# Altium PCB PCB1.PcbDoc (part 1 of 2)
Units mil, origin at the board's own origin, x right, y up, seen from the top; angles counter-clockwise.
Board outline 6000 x 4000 mil, 2 copper layers (Top Layer, Bottom Layer); 140 components, 124 nets, 525 pads, 86 vias.
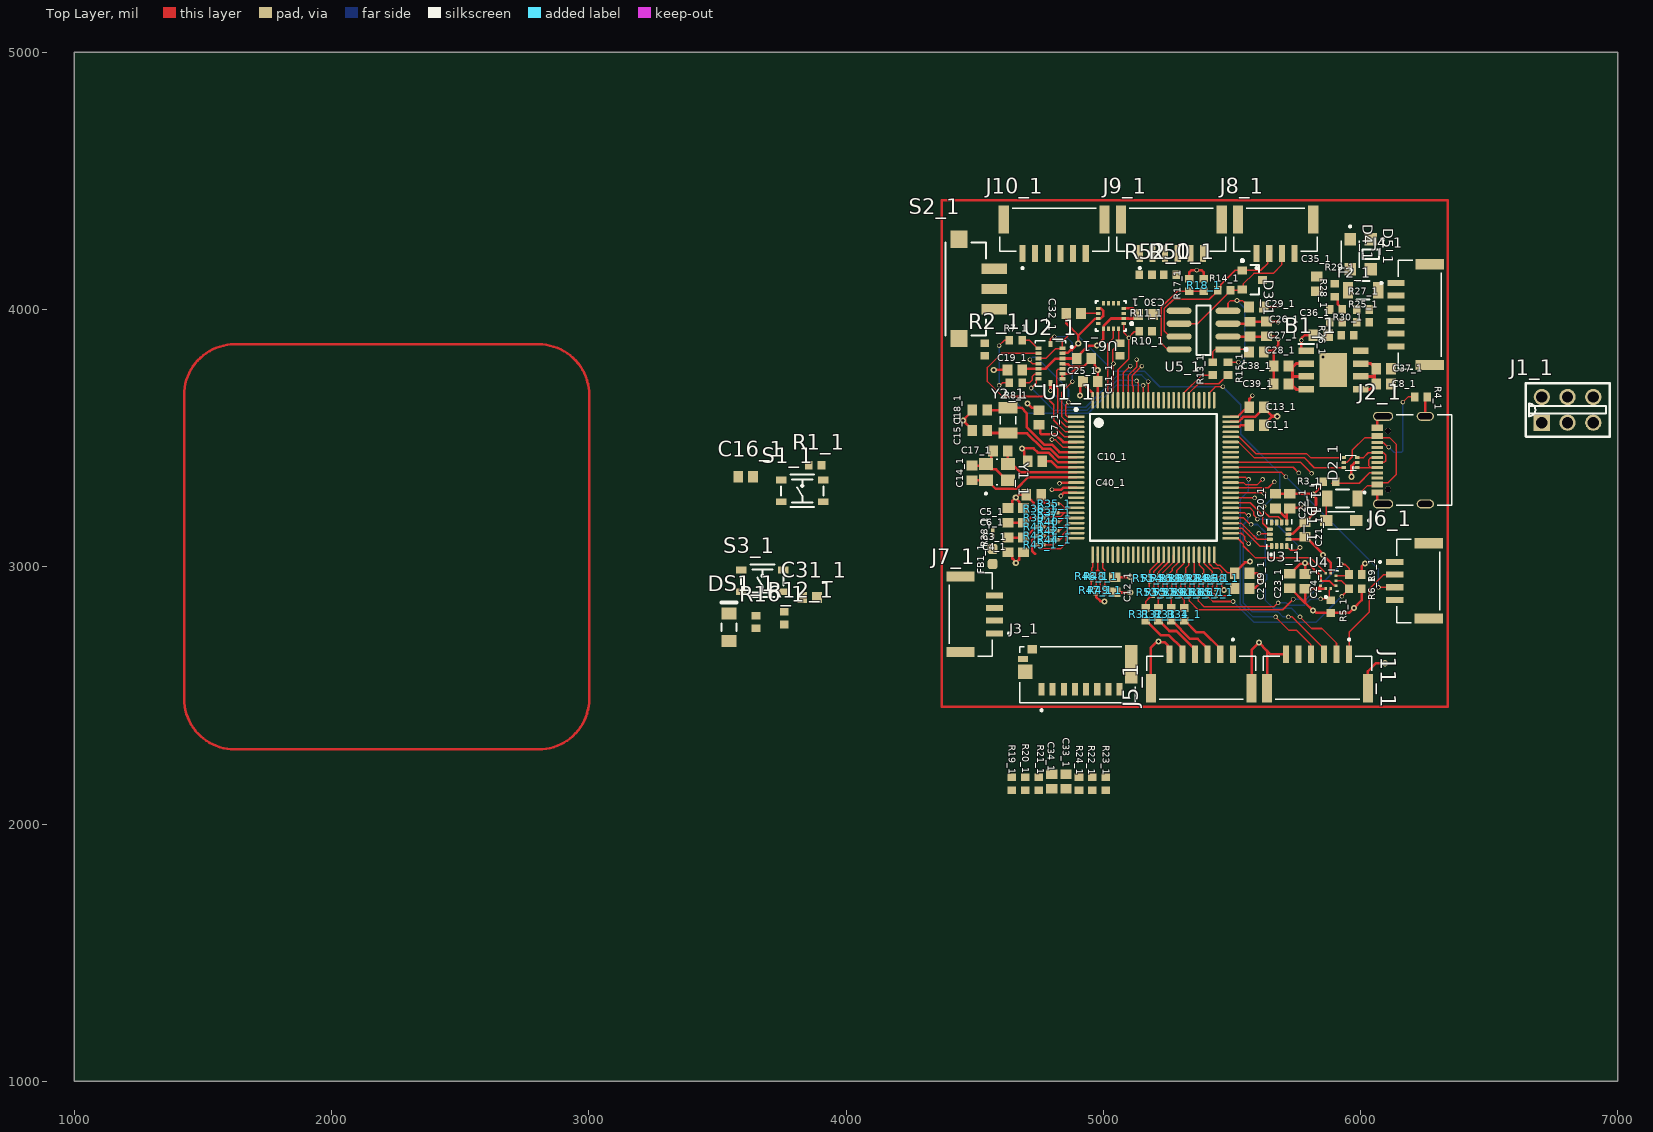
[diagram p0: Top Layer view]
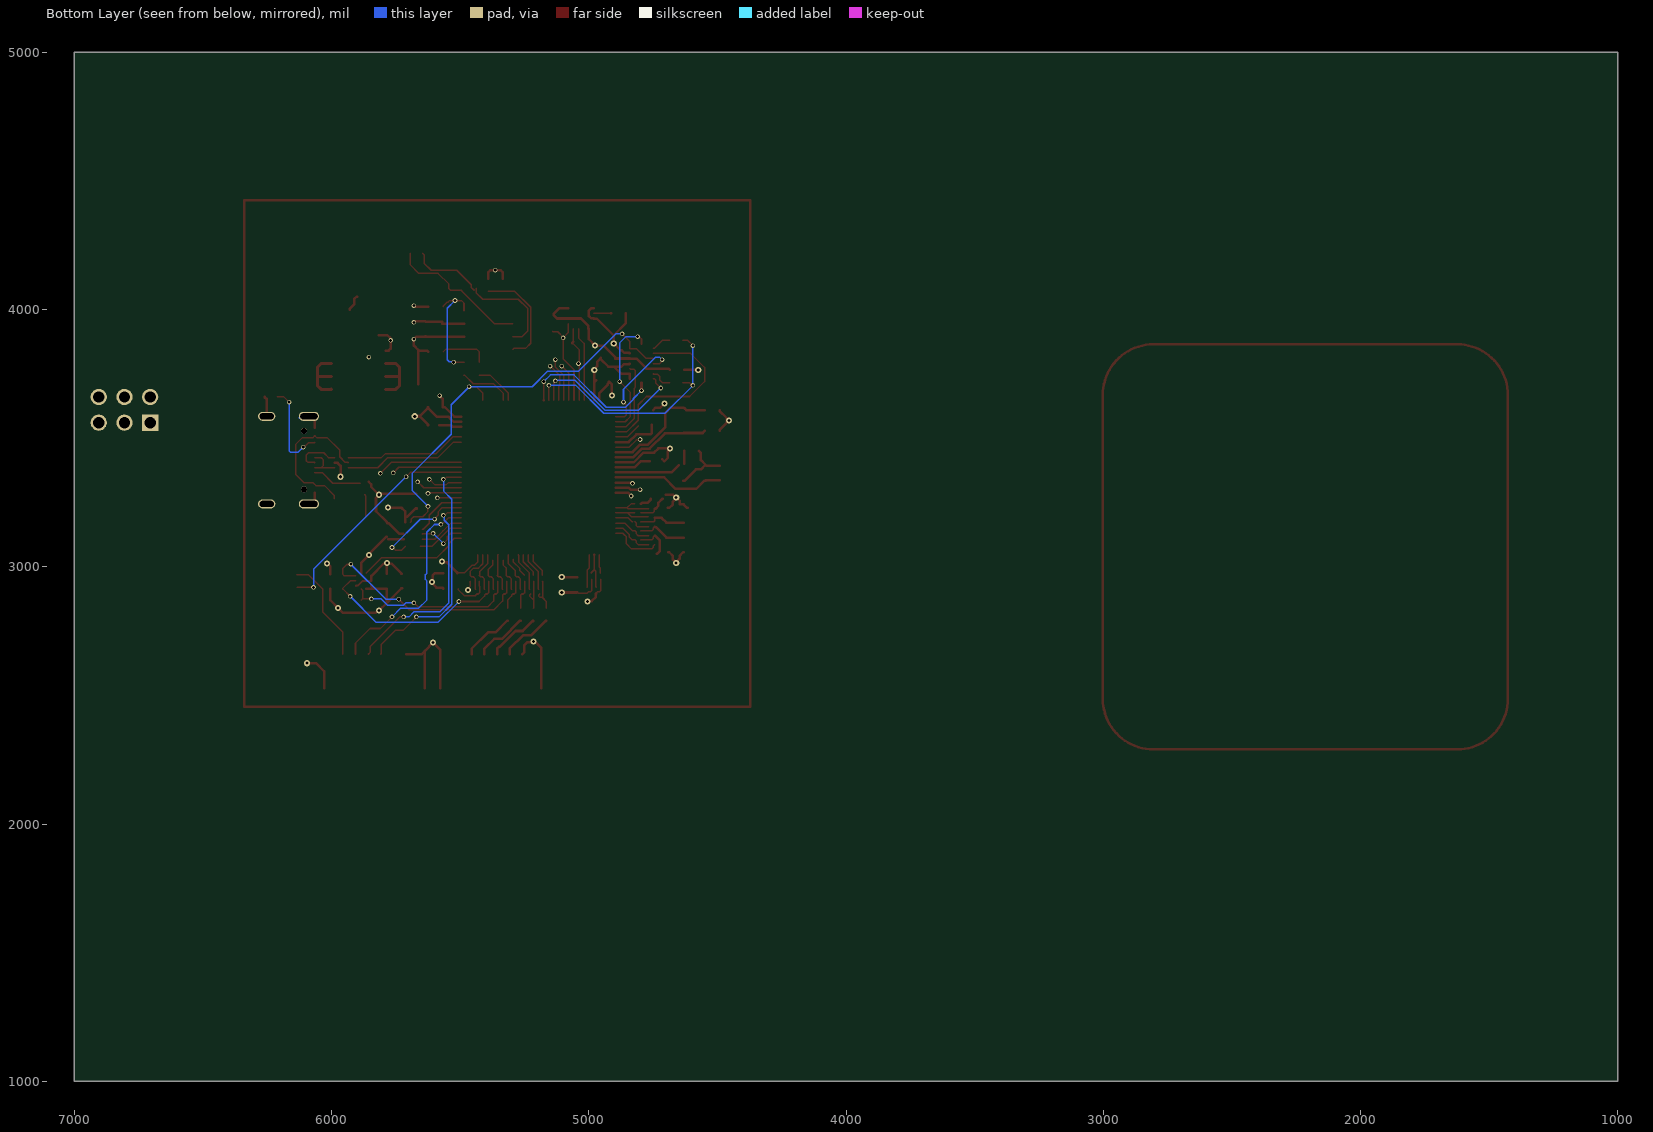
[diagram p1: Bottom Layer view, seen from below]

## Layer stack, top to bottom
Top Solder: solder mask 0.4, Solder Resist, Dk 3.5
Top Layer: signal copper 1.4
Dielectric 1: dielectric 12.6, FR-4, Dk 4.8
Bottom Layer: signal copper 1.4
Bottom Solder: solder mask 0.4, Solder Resist, Dk 3.5

## Board outline
1000,1000 7000,1000 7000,5000 1000,5000

## Design rules (kind name [scope] priority, off if disabled: settings)
Clearance [All] p1: gap=10 ignorepadtopadclearanceinfootprint=FALSE except(0: Arc-Hole Track-Hole SMDPad-Hole THPad-Hole Via-Hole Fill-Hole Poly-Hole Region-Hole Text-Hole)
PolygonConnect [All] p1: connectstyle=Relief reliefconductorwidth=10 reliefentries=4 polygonreliefangle="90 Angle" airgapwidth=10
RoutingVias [All] p1: holewidth=28 width=50 viastyle="Through Hole" minholewidth=28 minwidth=50 maxholewidth=28 maxwidth=50
SolderMaskExpansion [All] p1: expansion=4 istentingtop=FALSE
Width [All] p1: maxlimit=10 minlimit=10 preferedwidth=10
30 further rules are at their usual default settings.

## Components (designator, comment, footprint, x,y, rotation, side; value= is the part's Value field where it differs from the comment)
B1_1 "AP7362A-33SP-13" SOIC127P600X150-9N 5895,3765 r0 top
C1_1 "2.2uF" CAPC1608X92X38ML15T08 5596.46,3550 r180 top
C2_1 "2.2uF" CAPC1608X92X38ML15T08 5540,2915 r180 top
C3_1 "1uF" CAPC1608X92X38ML15T08 4630,3085 r90 top
C4_1 "0.1uF" CAPC1608X92X38ML15T08 4690,3085 r90 top
C5_1 "1uF" CAPC1608X92X38ML15T08 4630,3200 r270 top
C6_1 "0.1uF" CAPC1608X92X38ML15T08 4690,3200 r270 top
C7_1 "0.1uF" CAPC1608X92X38ML15T08 4750,3580 r90 top
C8_1 "4.7uF" CAPC1608X92X38ML15T08 6090,3710 r180 top
C9_1 "0.1uF" CAPC1608X92X38ML15T08 5540,2975 r180 top
C10_1 "0.1uF" CAPC1608X92X38ML15T08 4735,3410 r0 top
C11_1 "0.1uF" CAPC1608X92X38ML15T08 4950,3720 r180 top
C12_1 "0.1uF" CAPC1608X92X38ML15T08 5045,2930 r270 top
C13_1 "0.1uF" CAPC1608X92X38ML15T08 5596.46,3620 r180 top
C14_1 "15pF" CAPC1608X92X38ML15T08 4490,3365 r90 top
C15_1 "4.7pF" CAPC1608X92X38ML15T08 4520,3529.21 r180 top
C16_1 "0.1uF" CAPC1608X92X38ML15T08 3610,3350 r0 top
C17_1 "15pF" CAPC1608X92X38ML15T08 4600,3450 r180 top
C18_1 "4.7pF" CAPC1608X92X38ML15T08 4520,3609.21 r180 top
C19_1 "0.1uF" CAPC1608X92X38ML15T08 4656.46,3765 r0 top
C20_1 "0.1uF" CAPC1608X92X38ML15T08 5670,3255 r90 top
C21_1 "2.2uF" CAPC1608X92X38ML15T08 5785,3145 r90 top
C22_1 "10nF" CAPC1608X92X38ML15T08 5725,3255 r90 top
C23_1 "0.1uF" CAPC1608X92X38ML15T08 5725,2945 r90 top
C24_1 "0.1uF" CAPC1608X92X38ML15T08 5785,2943.54 r90 top
C25_1 "0.1uF" CAPC1608X92X38ML15T08 4925,3810 r180 top
C26_1 "1uF" CAPC1608X92X38ML15T08 5635,3925 r270 top
C27_1 "1uF" CAPC1608X92X38ML15T08 5570,3923.54 r270 top
C28_1 "10nF" CAPC1608X92X38ML15T08 5595,3835 r0 top
C29_1 "10nF" CAPC1608X92X38ML15T08 5595,4010 r0 top
C30_1 "1uF" CAPC1608X92X38ML15T08 5165,3980 r0 top
C31_1 "0.1uF" CAPC1608X92X38ML15T08 3858.54,2880 r0 top
C32_1 "10uF" CAPC1608X92X38ML15T08 4885,3985 r180 top
C33_1 "1uF" CAPC1608X92X38ML15T08 4855,2165 r90 top
C34_1 "0.1uF" CAPC1608X92X38ML15T08 4800,2165 r90 top
C35_1 "1nF" CAPC1608X92X38ML15T08 5830,4100 r270 top
C36_1 "1nF" CAPC1608X92X38ML15T08 5845,3900 r0 top
C37_1 "10uF" CAPC1608X92X38ML15T08 6090,3770 r180 top
C38_1 "0.1uF" CAPC1608X92X38ML15T08 5691.46,3780 r0 top
C39_1 "10uF" CAPC1608X92X38ML15T08 5691.46,3710 r0 top
C40_1 "0.1uF" CAPC1608X92X38ML15T08 4730,3280 r180 top
D1_1 "sch" SODFL3619X98N 5925,3180 r180 top
D2_1 "NUF2042XV6T1G" SOT-563 5961.57,3404.68 r90 top
D3_1 "TVS" ONSC-SOT-23-3-318-08_V 5580,4115 r0 top
D4_1 "sch" SODFL3619X98N 5960,4215 r270 top
D5_1 "TVS" ONSC-SOD-123FL-2-498_V 6040,4215 r270 top
DS1_1 "SML-LX1206YC-TR" LUMX-SML-LX1206YC-TR_V 3545,2765 r90 top
F1_1 "fuse" FP-MF-NSMF012-2-MFG 5930,3265 r180 top value=1.35-8.5Ω
F2_1 "fuse" FP-MF-NSMF012-2-MFG 6010,4075 r180 top value=1.35-8.5Ω
FB1_1 "100 Ohms @ 100 MHz" BEADC1608X75N 4570,3040 r90 top
J1_1 "6x1Female" stLinkHeader 6705,3560 r90 top
J2_1 "TYPE-C-31-M-12" HRO_TYPE-C-31-M-12 6252.01,3414.53 r90 top
J3_1 "10067099-200LF" AMPHENOL_10067099-200LF 4900,2580 r180 top
J4_1 "BM06B-GHS-TBT(LF)(SN)(N)" JST_BM06B-GHS-TBT(LF)(SN)(N) 6270,3980 r90 top
J5_1 "BM06B-GHS-TBT(LF)(SN)(N)" JST_BM06B-GHS-TBT(LF)(SN)(N) 5381.18,2528.11 r0 top
J6_1 "BM04B-GHS-TBT(LF)(SN)(N)" JST_BM04B-GHS-TBT(LF)(SN)(N) 6265,2945 r90 top
J7_1 "BM04B-GHS-TBT(LF)(SN)(N)" JST_BM04B-GHS-TBT(LF)(SN)(N) 4445,2815 r270 top
J8_1 "BM04B-GHS-TBT(LF)(SN)(N)" JST_BM04B-GHS-TBT(LF)(SN)(N) 5670,4350 r180 top
J9_1 "BM06B-GHS-TBT(LF)(SN)(N)" JST_BM06B-GHS-TBT(LF)(SN)(N) 5265,4350 r180 top
J10_1 "BM06B-GHS-TBT(LF)(SN)(N)" JST_BM06B-GHS-TBT(LF)(SN)(N) 4809.13,4350 r180 top
J11_1 "BM06B-GHS-TBT(LF)(SN)(N)" JST_BM06B-GHS-TBT(LF)(SN)(N) 5833.03,2528.11 r0 top
R1_1 "10 K" RESC1609X55X30LL10T20 3880,3395 r0 top
R2_1 "10 K" RESC1609X55X30LL10T20 4540,3845 r90 top
R3_1 "5.1 K" RESC1609X55X30LL10T20 5880,3330 r180 top
R4_1 "5.1 K" RESC1609X55X30LL10T20 6235,3660 r0 top
R5_1 "4.7 K" RESC1609X55X30LL10T20 5885,2845 r270 top
R6_1 "4.7 K" RESC1609X55X30LL10T20 5980.14,2915.02 r0 top
R7_1 "22 Ohm" RESC1609X55X30LL10T20 4660,3880 r180 top
R8_1 "22 Ohm" RESC1609X55X30LL10T20 4660,3715 r180 top
R9_1 "4.7 K" RESC1609X55X30LL10T20 5980.14,2970.02 r0 top
R10_1 "2.7 K" RESC1609X55X30LL10T20 5065,3845 r90 top
R11_1 "2.7 K" RESC1609X55X30LL10T20 5165,3915 r180 top
R12_1 "10 K" RESC1609X55X30LL10T20 3760,2800 r90 top
R13_1 "0 Ohm" RESC1609X55X30LL10T20 5425,3770 r270 top
R14_1 "120 Ohm" RESC1609X55X30LL10T20 5470,4075 r0 top
R15_1 "0 Ohm" RESC1609X55X30LL10T20 5485,3770 r270 top
R16_1 "500 Ohm" RESC1609X55X30LL10T20 3650,2785 r90 top
R17_1 "0 DNS" RESC1609X55X30LL10T20 5335,4095 r90 top
R18_1 "0 Ohm" RESC1609X55X30LL10T20 5390,4095 r90 top
R19_1 "4.7 K" RESC1609X55X30LL10T20 4645,2156.38 r270 top
R20_1 "4.7 K" RESC1609X55X30LL10T20 4697.14,2156.38 r270 top
R21_1 "4.7 K" RESC1609X55X30LL10T20 4749.29,2156.38 r270 top
R22_1 "4.7 K" RESC1609X55X30LL10T20 4957.86,2156.38 r270 top
R23_1 "4.7 K" RESC1609X55X30LL10T20 5010,2156.38 r270 top
R24_1 "47 Ohm" RESC1609X55X30LL10T20 4905.71,2156.38 r90 top
R25_1 "180 K" RESC1609X55X30LL10T20 6010,3950 r180 top
R26_1 "100 Ohm" RESC1609X55X30LL10T20 5905,3950 r180 top
R27_1 "15 K" RESC1609X55X30LL10T20 6010,4000 r180 top
R28_1 "100 Ohm" RESC1609X55X30LL10T20 5905,4000 r180 top
R29_1 "27 K" RESC1609X55X30LL10T20 5900,4075 r270 top
R30_1 "24 K" RESC1609X55X30LL10T20 5950,3900 r180 top
R31_1 "47 Ohm" RESC1609X55X30LL10T20 5165,2815 r90 top
R32_1 "47 Ohm" RESC1609X55X30LL10T20 5215,2815 r90 top
R33_1 "47 Ohm" RESC1609X55X30LL10T20 5265,2815 r90 top
R34_1 "47 Ohm" RESC1609X55X30LL10T20 5315,2815 r90 top
R35_1 "CRCW02010000Z0ED" RESC0603X28X15NL5T05 4810,3245 r0 top
R36_1 "CRCW02010000Z0ED" RESC0603X28X15NL5T05 4755,3225 r0 top
R37_1 "CRCW02010000Z0ED" RESC0603X28X15NL5T05 4810,3210 r0 top
R38_1 "CRCW02010000Z0ED" RESC0603X28X15NL5T05 4570,3130 r270 top
R39_1 "CRCW02010000Z0ED" RESC0603X28X15NL5T05 4755,3190 r0 top
R40_1 "CRCW02010000Z0ED" RESC0603X28X15NL5T05 4810,3175 r0 top
R41_1 "CRCW02010000Z0ED" RESC0603X28X15NL5T05 4755,3155 r0 top
R42_1 "CRCW02010000Z0ED" RESC0603X28X15NL5T05 4810,3140 r0 top
R43_1 "CRCW02010000Z0ED" RESC0603X28X15NL5T05 4755,3120 r0 top
R44_1 "CRCW02010000Z0ED" RESC0603X28X15NL5T05 4810,3105 r0 top
R45_1 "CRCW02010000Z0ED" RESC0603X28X15NL5T05 4755,3085 r0 top
R46_1 "CRCW02010000Z0ED" RESC0603X28X15NL5T05 4955,2963.19 r90 top
R47_1 "CRCW02010000Z0ED" RESC0603X28X15NL5T05 4970,2908.19 r90 top
R48_1 "CRCW02010000Z0ED" RESC0603X28X15NL5T05 4990,2963.19 r90 top
R49_1 "CRCW02010000Z0ED" RESC0603X28X15NL5T05 5005,2908.19 r90 top
R50_1 "0 Ohm" RESC1609X55X30LL10T20 5260,4135 r0 top
R51_1 "CRCW02010000Z0ED" RESC0603X28X15NL5T05 5180,2955 r90 top
R52_1 "0 Ohm" RESC1609X55X30LL10T20 5165,4135 r0 top
R53_1 "CRCW02010000Z0ED" RESC0603X28X15NL5T05 5195,2900 r90 top
R54_1 "CRCW02010000Z0ED" RESC0603X28X15NL5T05 5215,2955 r90 top
R55_1 "CRCW02010000Z0ED" RESC0603X28X15NL5T05 5230,2900 r90 top
R56_1 "CRCW02010000Z0ED" RESC0603X28X15NL5T05 5250,2955 r90 top
R57_1 "CRCW02010000Z0ED" RESC0603X28X15NL5T05 5265,2900 r90 top
R58_1 "CRCW02010000Z0ED" RESC0603X28X15NL5T05 5285,2955 r90 top
R59_1 "CRCW02010000Z0ED" RESC0603X28X15NL5T05 5300,2900 r90 top
R60_1 "CRCW02010000Z0ED" RESC0603X28X15NL5T05 5320,2955 r90 top
R61_1 "CRCW02010000Z0ED" RESC0603X28X15NL5T05 5335,2900 r90 top
R62_1 "CRCW02010000Z0ED" RESC0603X28X15NL5T05 5355,2955 r90 top
R63_1 "CRCW02010000Z0ED" RESC0603X28X15NL5T05 5370,2900 r90 top
R64_1 "CRCW02010000Z0ED" RESC0603X28X15NL5T05 5390,2955 r90 top
R65_1 "CRCW02010000Z0ED" RESC0603X28X15NL5T05 5405,2900 r90 top
R66_1 "CRCW02010000Z0ED" RESC0603X28X15NL5T05 5425,2955 r90 top
R67_1 "CRCW02010000Z0ED" RESC0603X28X15NL5T05 5440,2900 r90 top
R68_1 "CRCW02010000Z0ED" RESC0603X28X15NL5T05 5460,2955 r90 top
S1_1 "PTS810 SJM 250 SMTR LFS" button 3830,3295 r0 top
S2_1 "slideSwitch" switch 4465,4080 r0 top
S3_1 "PTS810 SJM 250 SMTR LFS" button 3675,2945 r0 top
U1_1 "STM32F765VGT6" FP-LQFP100-1L-IPC_B 5195.22,3347.17 r0 top
U2_1 "BMI088" PQFN50P450X300X100-16N 4795,3790 r270 top
U3_1 "ICM-42688-P" PQFN50P300X250X97-14N 5683.98,3126.46 r90 top
U4_1 "BMP390L" XDCR_BMP390L 5875.16,2945.02 r180 top
U5_1 "SN65HVD230DR" FP-D0008A-IPC_A 5390.02,3920 r180 top
U6_1 "MMC5983MA" Memsic_0_MFG 5030,3975 r180 top
Y1_1 "24 MHz" XTAL_TSX-3225_25.0000MF10P-C3 4587.05,3367.95 r90 top
Y2_1 "32 KHz" XTAL_ABS07-32.768KHZ-7-T 4630,3569.21 r270 top

## Footprints (in the part's own frame and the unit in brackets; to place one, negate y for a bottom-side part, rotate by r counter-clockwise, add the part's x,y. Pads: shape width x height; smd on the part's side, far side on the other; paste and mask are expansions set on the pad)
AMPHENOL_10067099-200LF [mm]
  rect 0.6x1.25 smd: 1(3.55,1.425) 2(2.45,1.425) 3(1.35,1.425) 4(0.25,1.425) 5(-0.85,1.425) 6(-1.95,1.425) 7(-3.05,1.425) 8(-4.15,1.425)
  rect 0.95x0.85 smd: DET_1(4.475,-2.525)
  rect 1x0.6 smd: DET_2(5.4,-1.55)
  rect 1.2x3.79 smd: S1(-5.3,-1.055)
  rect 1.45x1.4 smd: S2(5.175,-0.3)
  silkscreen extent -5.7,-2.75 5.7,3.6, body extent -5.7,-2.7 5.7,2.8, height 2.66
BEADC1608X75N [mm]
  rrect50% 1x0.97 smd: 1(-0.735,0) 2(0.735,0)
button [mm] "T-Switch, 4-leads, body 4.2x3.2mm, C&K PTS810 SJM 250 SMTR LFS"
  rect 1.05x0.65 smd mask+0.1: 1(-2.075,1.075) 2(2.075,1.075) 3(-2.075,-1.075) 4(2.075,-1.075)
  silkscreen extent -2.1,-1.6 2.1,1.6, body extent -2.29,-1.6 2.29,1.6, height 2.7
CAPC1608X92X38ML15T08 [mm] "Chip Capacitor, 2-Leads, Body 1.60x0.80mm, IPC Low Density"
  rect 0.95x1.1 smd: 1(-0.725,0) 2(0.725,0)
  body extent -0.87,-0.48 0.87,0.47, height 0.92
FP-D0008A-IPC_A [mil]
  rect 97.21x24.49 smd paste+0 mask+0: 1(-95.02,75)
  rrect100% 97.21x24.49 smd paste+0 mask+0: 2(-95.02,25) 3(-95.02,-25) 4(-95.02,-75) 5(95.02,-75) 6(95.02,-25) 7(95.02,25) 8(95.02,75)
  silkscreen extent -170,-97 27,97, body extent -118,-96 118,96, height 69
FP-LQFP100-1L-IPC_B [mm]
  rect 1.655x0.252 smd paste+0 mask+0: 1(-7.625,6)
  rrect100% 1.655x0.252 smd paste+0 mask+0: 2(-7.625,5.5) 3(-7.625,5) 4(-7.625,4.5) 5(-7.625,4) 6(-7.625,3.5) 7(-7.625,3) 8(-7.625,2.5) 9(-7.625,2) 10(-7.625,1.5) 11(-7.625,1) 12(-7.625,0.5) 13(-7.625,0) 14(-7.625,-0.5) 15(-7.625,-1) 16(-7.625,-1.5) 17(-7.625,-2) 18(-7.625,-2.5) 19(-7.625,-3) 20(-7.625,-3.5) 21(-7.625,-4) 22(-7.625,-4.5) 23(-7.625,-5) 24(-7.625,-5.5) 25(-7.625,-6) 51(7.625,-6) 52(7.625,-5.5) 53(7.625,-5) 54(7.625,-4.5) 55(7.625,-4) 56(7.625,-3.5) 57(7.625,-3) 58(7.625,-2.5) 59(7.625,-2) 60(7.625,-1.5) 61(7.625,-1) 62(7.625,-0.5) 63(7.625,0) 64(7.625,0.5) 65(7.625,1) 66(7.625,1.5) 67(7.625,2) 68(7.625,2.5) 69(7.625,3) 70(7.625,3.5) 71(7.625,4) 72(7.625,4.5) 73(7.625,5) 74(7.625,5.5) 75(7.625,6)
  rrect100% 0.252x1.655 smd paste+0 mask+0: 26(-6,-7.625) 27(-5.5,-7.625) 28(-5,-7.625) 29(-4.5,-7.625) 30(-4,-7.625) 31(-3.5,-7.625) 32(-3,-7.625) 33(-2.5,-7.625) 34(-2,-7.625) 35(-1.5,-7.625) 36(-1,-7.625) 37(-0.5,-7.625) 38(0,-7.625) 39(0.5,-7.625) 40(1,-7.625) 41(1.5,-7.625) 42(2,-7.625) 43(2.5,-7.625) 44(3,-7.625) 45(3.5,-7.625) 46(4,-7.625) 47(4.5,-7.625) 48(5,-7.625) 49(5.5,-7.625) 50(6,-7.625) 76(6,7.625) 77(5.5,7.625) 78(5,7.625) 79(4.5,7.625) 80(4,7.625) 81(3.5,7.625) 82(3,7.625) 83(2.5,7.625) 84(2,7.625) 85(1.5,7.625) 86(1,7.625) 87(0.5,7.625) 88(0,7.625) 89(-0.5,7.625) 90(-1,7.625) 91(-1.5,7.625) 92(-2,7.625) 93(-2.5,7.625) 94(-3,7.625) 95(-3.5,7.625) 96(-4,7.625) 97(-4.5,7.625) 98(-5,7.625) 99(-5.5,7.625) 100(-6,7.625)
  silkscreen extent -7.75,-6.25 6.25,6.83, body extent -8.7,-8.7 8.7,8.7, height 0.25
FP-MF-NSMF012-2-MFG [mm]
  rect 1x1.6 smd paste+0 mask+0: 1(-1.5,0) 2(1.5,0)
  silkscreen extent -0.63,-0.9 0.63,0.9, body extent -2.1,-1 2.1,1, height 0.25
HRO_TYPE-C-31-M-12 [mm]
  rect 0.6x1.14 smd mask+0.05: A1_B12(-3.2,4.75) A4_B9(-2.4,4.75) B1_A12(3.2,4.75) B4_A9(2.4,4.75)
  rect 0.3x1.14 smd mask+0.05: A5(-1.25,4.75) A6(-0.25,4.75) A7(0.25,4.75) A8(1.25,4.75) B5(1.75,4.75) B6(0.75,4.75) B7(-0.75,4.75) B8(-1.75,4.75)
  oval 0.9x2 hole 0.6 slot 1.7 at 90 deg: S1(-4.325,4.17) S2(4.325,4.17)
  oval 0.9x1.7 hole 0.6 slot 1.4 at 90 deg: S3(-4.325,0) S4(4.325,0)
  round 0.6 hole 0.6 unplated: ""(-2.89,3.68) ""(2.89,3.68)
  silkscreen extent -4.47,-2.6 4.47,6.1, body extent -4.47,-2.6 4.47,5.31, height 3.31
JST_BM04B-GHS-TBT(LF)(SN)(N) [mm]
  rect 0.6x1.7 smd: 1(1.875,3.35) 2(0.625,3.35) 3(-0.625,3.35) 4(-1.875,3.35)
  rect 1x2.8 smd: S1(-3.725,0) S2(3.725,0)
  silkscreen extent -4.13,-1.1 4.13,4.9, body extent -4.03,-1.05 4.23,3.8, height 4.25
JST_BM06B-GHS-TBT(LF)(SN)(N) [mm]
  rect 0.6x1.7 smd: 1(3.125,3.35) 2(1.875,3.35) 3(0.625,3.35) 4(-0.625,3.35) 5(-1.875,3.35) 6(-3.125,3.35)
  rect 1x2.8 smd: S1(-4.975,0) S2(4.975,0)
  silkscreen extent -5.38,-1.1 5.38,4.9, body extent -5.38,-1.1 5.38,3.75, height 4.25
LUMX-SML-LX1206YC-TR_V [mm] "SMD, 2-Leads, Body 3.2x1.5mm"
  rect 1.2x1.5 smd: 1(-1.35,0) 2(1.35,0)
  silkscreen extent -0.35,-0.75 2.45,0.75, body extent -1.6,-0.75 1.6,0.75, height 1.25
Memsic_0_MFG [mm]
  rect 0.45x0.3 smd paste+0 mask+0: 1(-1.275,0.75) 2(-1.275,0.25) 3(-1.275,-0.25) 4(-1.275,-0.75) 9(1.275,-0.75) 10(1.275,-0.25) 11(1.275,0.25) 12(1.275,0.75)
  rect 0.3x0.45 smd paste+0 mask+0: 5(-0.75,-1.275) 6(-0.25,-1.275) 7(0.25,-1.275) 8(0.75,-1.275) 13(0.75,1.275) 14(0.25,1.275) 15(-0.25,1.275) 16(-0.75,1.275)
  silkscreen extent -2.18,-1.5 1.5,1.5, body extent -2,-2 2,2, height 0.25
ONSC-SOD-123FL-2-498_V [mm] "SOD, 2-Leads, Body 2.7x1.65mm"
  rect 1.25x1.22 smd: 1(-1.475,0) 2(1.475,0)
  silkscreen extent -1.6,-0.82 0.45,1.29, body extent -1.35,-0.82 1.35,0.82, height 0.98
ONSC-SOT-23-3-318-08_V [mm] "SOT23, 3-Leads, Body 2.92x1.3mm, Pitch 0.95mm"
  rect 0.9x0.8 smd: 1(-1,0.95) 2(-1,-0.95) 3(1,0)
  silkscreen extent -1.12,-1.46 0.65,2.02, body extent -0.65,-1.46 0.65,1.46, height 1.11
PQFN50P300X250X97-14N [mm]
  rrect50% 0.59x0.35 smd mask+0: 1(-1.165,0.75) 2(-1.165,0.25) 3(-1.165,-0.25) 4(-1.165,-0.75) 8(1.165,-0.75) 9(1.165,-0.25) 10(1.165,0.25) 11(1.165,0.75)
  rrect50% 0.35x0.59 smd mask+0: 5(-0.5,-0.915) 6(0,-0.915) 7(0.5,-0.915) 12(0.5,0.915) 13(0,0.915) 14(-0.5,0.915)
  silkscreen extent -2.1,-1.25 1.5,1.25, body extent -1.5,-1.25 1.5,1.25, height 0.97
PQFN50P450X300X100-16N [mm]
  rect 0.35x0.59 smd: 1(-1.5,1.165) 2(-1,1.165) 3(-0.5,1.165) 4(0,1.165) 5(0.5,1.165) 6(1,1.165) 7(1.5,1.165) 9(1.5,-1.165) 10(1,-1.165) 11(0.5,-1.165) 12(0,-1.165) 13(-0.5,-1.165) 14(-1,-1.165) 15(-1.5,-1.165)
  rect 0.59x0.35 smd: 8(1.915,0) 16(-1.915,0)
  silkscreen extent -2.25,-1.5 2.25,2.2, body extent -2.25,-1.5 2.25,1.5, height 1
RESC0603X28X15NL5T05 [mm] "Chip Resistor, 2-Leads, Body 0.65x0.35mm, IPC Medium Density"
  rect 0.45x0.35 smd: 1(-0.3,0) 2(0.3,0)
  body extent -0.33,-0.18 0.33,0.18, height 0.28
RESC1609X55X30LL10T20 [mm] "Chip Resistor, 2-Leads, Body 1.60x0.85mm, IPC High Density"
  rect 0.75x0.85 smd: 1(-0.625,0) 2(0.625,0)
  body extent -0.85,-0.48 0.85,0.48, height 0.55
SODFL3619X98N [mm]
  rect 1.24x1.12 smd: A(1.49,0) K(-1.49,0)
  silkscreen extent -2.85,-0.87 1.35,0.87, body extent -1.8,-0.82 1.8,0.82, height 0.98
SOIC127P600X150-9N [mm]
  rect 1.525x0.65 smd: 1(-2.688,1.905) 2(-2.688,0.635) 3(-2.688,-0.635) 4(-2.688,-1.905) 5(2.688,-1.905) 6(2.688,-0.635) 7(2.688,0.635) 8(2.688,1.905)
  rect 2.71x3.35 smd: 9(0,0)
  silkscreen extent -3.45,2.58 -1.92,2.58, body extent -3,-2.4 3,2.5, height 1.5
SOT-563 [mm]
  rect 0.3x0.45 smd paste-0.025 mask+0.025: 1(-0.5,-0.675) 2(0,-0.675) 3(0.5,-0.675) 4(0.5,0.675) 5(0,0.675) 6(-0.5,0.675)
  silkscreen extent -0.75,-0.55 0.75,0.55, body extent -0.8,-0.8 0.8,0.8, height 0.6
stLinkHeader [mm]
  rect 1.6x1.6 hole 1.1: 1(0,0)
  round 1.6 hole 1.1: 2(0,-2.54) 3(0,-5.08) 4(2.54,-5.08) 5(2.54,-2.54) 6(2.54,0)
  silkscreen extent -1.4,-6.7 3.9,1.6, body extent -1.27,-6.6 3.79,1.52, height 5.01
switch [mm]
  rect 2.55x1 smd: 1(2.825,-2) 2(2.825,0) 3(2.825,2)
  rect 1.7x1.7 smd: M(-0.65,-4.9) M(-0.65,4.9)
  silkscreen extent -2,-4.6 2,4.6, body extent -3.98,-5.25 3.42,5.25, height 2.9
XDCR_BMP390L [mm]
  rect 0.25x0.275 smd: 1(0.25,0.763) 2(-0.25,0.763) 6(-0.25,-0.763) 7(0.25,-0.763)
  rect 0.275x0.25 smd: 3(-0.763,0.5) 4(-0.763,0) 5(-0.763,-0.5) 8(0.763,-0.5) 9(0.763,0) 10(0.763,0.5)
  silkscreen extent -1,-1 1,1.69, body extent -1,-1 1,1, height 0.8
XTAL_ABS07-32.768KHZ-7-T [mm]
  rect 1.1x1.9 smd: 1(-1.25,0) 2(1.25,0)
  silkscreen extent -0.38,-0.75 0.38,0.75, body extent -1.6,-0.75 1.6,0.75, height 0.89
XTAL_TSX-3225_25.0000MF10P-C3 [mm]
  rect 1.15x1.4 smd: 1(-0.8,1.1) 2(-0.8,-1.1) 3(0.8,-1.1) 4(0.8,1.1)
  silkscreen extent -2.22,-0.08 1.25,1.2, body extent -1.25,-1.6 1.25,1.6, height 0.6

## Part data
B1_1: "LDO Voltage Regulators LDO CMOS HiCurr SO-8 1.5A LowQ Adj 190mV", Manufacturer_Name="Diodes Incorporated", Mouser Part Number=621-AP7362A-33SP-13, Arrow Part Number=AP7362A-33SP-13, Arrow Price/Stock=https://www.arrow.com/en/products/ap7362a-33sp-13/diodes-incorporated?utm_currency=USD&region=nac, Datasheet Link=https://www.diodes.com/assets/Datasheets/AP7362.pdf, Geometry.Height=1.5mm, Manufacturer_Part_Number=AP7362A-33SP-13, Mouser Price/Stock=https://www.mouser.co.uk/ProductDetail/Diodes-Incorporated/AP7362A-33SP-13?qs=M%2FOdCRO8QQ3CiX1oDLy5Bg%3D%3D
C1_1 C2_1 C3_1 C4_1 C5_1 C6_1 C7_1 C8_1 C9_1 C10_1 C11_1 C12_1 C13_1 C14_1 C15_1 C16_1 C17_1 C18_1 C19_1 C20_1 C21_1 C22_1 C23_1 C24_1 C25_1 C26_1 C27_1 C28_1 C29_1 C30_1 C31_1 C32_1 C33_1 C34_1 C35_1 C36_1 C37_1 C38_1 C39_1: library part 0603-Cap
C40_1: library part CMP-2006-01393-1, manufacturer=Vitramon, Part Number=VJ0603Y332KXJAC
D1_1 D4_1: library part MBR230LSFT1G, "DIODE SCHOTTKY 30V 2A SOD123 MBR230LSTR", Package="SOD-123FL-2 ON Semiconductor", Check_prices=https://www.snapeda.com/parts/MBR230LSFT1G/Onsemi/view-part/?ref=eda, MF="ON Semiconductor", MP=MBR230LSFT1G, SnapEDA_Link=https://www.snapeda.com/parts/MBR230LSFT1G/Onsemi/view-part/?ref=snap
D2_1: "RC (Pi) EMI Filter 2nd Order Low Pass 2 Channel R = 22Ohms, C = 42pF (Total) SOT-563, SOT-666", Package="SOT-563-6 ON Semiconductor", Check_prices=https://www.snapeda.com/parts/NUF2042XV6T1G/Onsemi/view-part/?ref=eda, MF=onsemi, MP=NUF2042XV6T1G, SnapEDA_Link=https://www.snapeda.com/parts/NUF2042XV6T1G/Onsemi/view-part/?ref=snap
D3_1: library part CMP-1063-00164-1, "Dual Line CAN Bus Protector, 3-Pin SOT-23, Pb-Free, Tape and Reel", manufacturer="On Semiconductor", PartNumber=NUP2105LT1G, C Max (pF)=30, componentlink1description="Manufacturer URL", componentlink1url=http://www.onsemi.com/, componentlink2description=Datasheet, componentlink2url=http://www.onsemi.cn/pub_link/Collateral/NUP2105L-D.PDF, ComponentLink3Description="Package Specification", ComponentLink3URL=http://www.onsemi.cn/pub_link/Collateral/318-08.PDF, DatasheetVersion="Rev. 5", Direction=Bidirectional, Mounting Technology="Surface Mount", Number of Lines=2, PackageDescription="3-Pin Small Outline Transistor, Body 2.92 x 1.3 mm, Pitch 0.95 mm", PackageReference=SOT-23-3-318-08, PackageVersion="Rev. AP, 11/2009", Packing="Tape and Reel", PPK Max (W)=350, RoHS=Pb-Free, V(BR) Min (V)=26.2, IR Max (uA)=0.1
D5_1: library part CMP-1061-00612-1, "200 W Transient Voltage Suppressor, 2-Pin SOD-123FL, Pb-Free, Tape and Reel", manufacturer="On Semiconductor", PartNumber=SMF5.0AT1G, componentlink1description="Manufacturer URL", componentlink1url=http://www.onsemi.com/, componentlink2description=Datasheet, componentlink2url=http://www.onsemi.com/pub_link/Collateral/SMF5.0AT1-D.PDF, ComponentLink3Description="Package Specification", ComponentLink3URL=http://www.onsemi.com/pub_link/Collateral/498-01.PDF, DatasheetVersion="Rev. 7", Direction=Unidirectional, Mounting Technology="Surface Mount", PackageDescription="2-Pin SOD, Body 1.65 x 2.7 mm", PackageReference=SOD-123FL-2-498, PackageVersion="Rev. D, 05/2013", Packing="Tape and Reel", RoHS=Pb-Free, V(BR) Typ (V)=6.7, IR Max (uA)=400
DS1_1: library part CMP-2000-07124-1, "Yellow LED, Water Clear Len, 585 nm, 2.1 V, -40 to 85 degC, 2-Pin SMD, RoHS, Tape and Reel", Color=Yellow, Current - Test=20mA, Lens Color=Colorless, manufacturer=Lumex, Millicandela Rating=6mcd, Package / Case=1206(3216Metric), Package Description="2-Pin Surface Mount Device, Body 3.2 x 1.5 mm", Standard Package=3,000, Supplier Device Package=1206, Voltage - Forward (Vf) (Typ)=2.1V, Catalog Drawings=SML-LX1206SeriesTopSML-LX1206SeriesSideSML-LX1206SeriesBottomSML-LX1206SeriesFootprint, Category=Optoelectronics, Datasheet URL=http://www.lumex.com/content/files/ProductAttachment/SML-LX1206YC-TR.pdf, Datasheet Version="Rev. K, 08/2012", Family=LEDIndication-Discrete, Features=-, Height (Max)=1.10mm, Lens Style/Size=RectanglewithFlatTop, Lens Transparency=Clear, Manufacturer URL=http://www.lumexinstruments.com/, Mounting Technology=SurfaceMount, Mounting Type=SurfaceMount, Online Catalog=SML-LX1206RectanglewithFlatTop1206PackageLEDs, Other Names=67-1358-2LU60357TRSMLLX1206YCTR, Package Reference=SML-LX1206YC-TR, packaging=Tape&Reel(TR), Product Training Modules=LEDsBenefitsofCustomLEDandLCDTechnology, RoHS Information=RoHSCertofCompliance, series=-, Size / Dimension=3.20mmLx1.60mmW, Viewing Angle=160°, Wavelength - Dominant=-, Wavelength - Peak=585nm
F1_1 F2_1: library part CMP-07400-000025-1, "PTC RESET FUSE 30V 120MA 1206", Ambient Temperature Range High=+85°C, Ambient Temperature Range Low=-40°C, Current Rating=10A, Hold Current=0.12A, manufacturer="Bourns Inc.", Manufacturer Part Number=MF-NSMF012-2, Resistance=1.35-8.5Ω, Temperature="-40°C to +85°C", Trip Current=0.29A, Voltage Rating=30V, Automotive=Yes, Automotive Grade="Grade 3", Category=Fuse, componentlink2description=Datasheet, componentlink2url=https://www.bourns.com/docs/Product-Datasheets/mfnsmf.pdf, Device Class L1="Circuit Protection", Device Class L2="PTC Resettable Fuses", Device Class L3=unset, Digikey Description="PTC RESET FUSE 30V 120MA 1206", Height=1.1mm, Lead Free=Yes, Mouser Description="Resettable Fuses - PPTC 0.12A 30V 1.35ohm", Octopart=https://octopart.com/mf-nsmf012-2-bourns-24569, Package=MF-NSMF012-2, RoHS=TRUE, Temperature Range High=+85°C, Temperature Range Low=-40°C, Trip Time=0.2s
FB1_1: library part MPZ1608D101BTA00, "Ferrite Beads Multi-Layer High Current 600Ohm 25% 100MHz 2.3A 0.06Ohm DCR 0805 Automotive T/R", Case/Package=0805, Current Rating=1.5A, Current Rating (Max)=1A, DC Resistance (DCR)=60mΩ, DC Resistance (DCR) (Max)=150mOhm, Device Package="0603 (1608 Metric)", manufacturer="TDK Corporation", Manufacturer Part Number=BLM21SP601SH1D, Max Operating Temperature=125°C, Min Operating Temperature=-55°C, Operating Temperature="-55°C ~ 125°C", RMS Current (Irms)=2.3A, Supplier Part Number=3227839, Supplier Part Number 1=445-MPZ1608D101BTA00CT-ND, Test Frequency=100MHz, Tolerance=25%, Category="Ferrite Beads and Chips", componentlink1description=Datasheet, componentlink1url=https://product.tdk.com/info/en/catalog/datasheets/beads_commercial_power_mpz1608_en.pdf?ref_disty=digikey, componentlink2description="DigiKey Link", componentlink2url=https://www.digikey.com/en/products/detail/tdk-corporation/MPZ1608D101BTA00/1084520, ComponentLink3Description=https://datasheet.octopart.com:443/BLM21SP601SH1D-Murata-datasheet-180807142.pdf?src-supplier=IHS, ComponentLink3URL=https://datasheet.octopart.com:443/BLM21SP601SH1D-Murata-datasheet-180807142.pdf?src-supplier=IHS, ComponentLink4Description=https://datasheet.octopart.com:443/BLM21SP601SH1D-Murata-datasheet-138707483.pdf?src-supplier=ODG+(Origin+Data+Global), ComponentLink4URL=https://datasheet.octopart.com:443/BLM21SP601SH1D-Murata-datasheet-138707483.pdf?src-supplier=ODG+(Origin+Data+Global), ComponentLink5Description=https://datasheet.octopart.com:443/BLM21SP601SH1D-Murata-datasheet-166171483.pdf?src-supplier=TME, ComponentLink5URL=https://datasheet.octopart.com:443/BLM21SP601SH1D-Murata-datasheet-166171483.pdf?src-supplier=TME, ComponentLink6Description=http://sigma.octopart.com:80/reach_statement/Murata-company-16.pdf?src-supplier=Compliance+Statements, ComponentLink6URL=http://sigma.octopart.com:80/reach_statement/Murata-company-16.pdf?src-supplier=Compliance+Statements, Core Material=Ferrite, ESR=60mΩ, Filter Type="Power Line", Height=850µm, Height (Max)="0.037\" (0.95mm)", lastupdated="3/06/2024 19:51:52", Length=2mm, Lifecycle Status=Active, Minimum Order=1, Mounting Type="Surface Mount", Number of Circuits=1, Number of Lines=1, Number of Terminals=2, Package / Case="0603 (1608 Metric)", packaging=TapeAndReel, Part Number=MPZ1608D101BTA00, Part Status=Active, partid=843, Price=0.02, Pricing="10=0,218, 100=0,151, 500=0,108, 1000=0,0961, 2000=0,0879, 4000=0,0797 (EUR)", REACH SVHC=Yes, RoHS=Compliant, Schedule B="8504500000, 8543706000, 8543706000|8543706000, 8543706000|8543706000|8543706000", series=MPZ, Size / Dimension="0.063\" L x 0.032\" W (1.60mm x 0.80mm)", Stock=12289, Supplier=Farnell, Supplier 1=DigiKey, Width=1.25mm, Impedance=600Ω, Impedance @ Frequency="100 Ohms @ 100 MHz"
J1_1: library part STLinkHeader, "Female, 6 C, Straight, .100\"CC; 3.20mm Tail, No Mt. 100u\" Tin; PBT, Phos Bronze, 105 C", manufacturer=Sullins, Manufacturer Part Number=PPTC061LFBN-RC, Supplier Part Number=5286703, Category=Connectors, componentlink1description=https://media.digikey.com/pdf/Data%20Sheets/Sullins%20PDFs/Female_Headers.100_DS.pdf?src-supplier=Digikey, componentlink1url=https://media.digikey.com/pdf/Data%20Sheets/Sullins%20PDFs/Female_Headers.100_DS.pdf?src-supplier=Digikey, componentlink2description=https://datasheet.octopart.com/PPTC061LFBN-RC-Sullins-datasheet-41308905.pdf?src-supplier=Future+Electronics, componentlink2url=https://datasheet.octopart.com/PPTC061LFBN-RC-Sullins-datasheet-41308905.pdf?src-supplier=Future+Electronics, ComponentLink3Description=http://www.sullinscorp.com/catalogs/78_Page80-81_HEADER_.100_2.54mm_FEMALE.pdf?src-supplier=Future+Electronics, ComponentLink3URL=http://www.sullinscorp.com/catalogs/78_Page80-81_HEADER_.100_2.54mm_FEMALE.pdf?src-supplier=Future+Electronics, Pricing="560=0,255, 2240=0,25, 8400=0,24 (USD)", RoHS=Yes, Supplier="Future Electronics"
J2_1: "USB Connectors 24 Receptacle 1 8.94*7.3mm RoHS", Package=Package, Availability="Not in stock", Check_prices=https://www.snapeda.com/parts/TYPE-C-31-M-12/HRO+Electronics+Co.%252C+Ltd./view-part/?ref=eda, MF="HRO Electronics Co., Ltd.", MP=TYPE-C-31-M-12, Price=None, SnapEDA_Link=https://www.snapeda.com/parts/TYPE-C-31-M-12/HRO+Electronics+Co.%252C+Ltd./view-part/?ref=snap
J3_1: Package=None, Availability=Unavailable, MF="{'manufacturer': u'Amphenol ICC (FCI)'}", MP=10067099-200LF, Price=None
J4_1 J5_1 J9_1 J10_1 J11_1: "Connector Header Surface Mount 6 position 0.049 (1.25mm)", Package=None, Check_prices=https://www.snapeda.com/parts/BM06B-GHS-TBT(LF)(SN)(N)/JST/view-part/?ref=eda, MF="JST Sales", MP=BM06B-GHS-TBT(LF)(SN)(N), SnapEDA_Link=https://www.snapeda.com/parts/BM06B-GHS-TBT(LF)(SN)(N)/JST/view-part/?ref=snap
J6_1 J7_1 J8_1: "Conn Shrouded Header HDR 4 POS 1.25mm Solder ST Top Entry SMD T/R", Package=None, Check_prices=https://www.snapeda.com/parts/BM04B-GHS-TBT%20(LF)(SN)(N)/JST/view-part/?ref=eda, MF=JST, MP="BM04B-GHS-TBT (LF)(SN)(N)", SnapEDA_Link=https://www.snapeda.com/parts/BM04B-GHS-TBT%20(LF)(SN)(N)/JST/view-part/?ref=snap
R1_1 R2_1 R3_1 R4_1 R5_1 R6_1 R7_1 R8_1 R9_1 R10_1 R11_1 R12_1 R13_1 R14_1 R15_1 R16_1 R17_1 R18_1 R19_1 R20_1 R21_1 R22_1 R23_1 R24_1 R25_1 R26_1 R27_1 R28_1 R29_1 R30_1 R31_1 R32_1 R33_1 R34_1 R35_1 R36_1 R37_1 R38_1 R54_1 R56_1: library part 0603-Res
R39_1 R40_1 R41_1 R42_1 R43_1 R44_1 R45_1 R46_1 R47_1 R48_1 R49_1 R50_1 R51_1 R52_1 R53_1 R55_1 R57_1 R58_1 R59_1 R60_1 R61_1 R62_1 R63_1 R64_1 R65_1 R66_1 R67_1 R68_1: library part CMP-2004-00001-2, "Chip Resistor, 0 Ohm, Jumper, 0.05 W, -55 to 155 degC, 0201 (0603 Metric), RoHS, Tape and Reel", Case Code (Metric)=0603, Case Code (Imperial)=0201, Max Operating Temperature="155 degC", Min Operating Temperature="-55 degC", Package Quantity=1, Power Rating="50 mW", Resistance="0 mohm", Tolerance=5%, Voltage Rating="30 V", Case\Package=0201, componentlink1description="Manufacturer URL", componentlink1url=http://www.vishay.com/, componentlink2description=Datasheet, componentlink2url=http://www.vishay.com/docs/20052/crcw0201e3.pdf, DatasheetVersion=03/2016, Height="0.23 mm", Length="0.6 mm", Mount="Surface Mount", Mounting Technology="Surface Mount", PackageDescription="2-Pin Surface Mount Device, Body 0.6 x 0.3 mm", PackageReference=0201, packaging="Cut Tape", Radiation Hardening=No, REACH SVHC=Unknown, RoHSCompliant=true, Weight="6E-06 oz", Width="0.3 mm"
S1_1 S3_1: "SWITCH TACTILE SPST-NO 0.05A 16V", Contact Rating @ Voltage="0.05A @ 16VDC", manufacturer=C&K, Operating Force=160gf, Operating Temperature="-40°C ~ 85°C", Supplier Part Number 1=CKN10502CT-ND, Actuator Height off PCB, Vertical=2.50mm, Actuator Orientation="Top Actuated", Actuator Type="Oval Button", Circuit=SPST-NO, componentlink1description=Datasheet, componentlink1url=https://dznh3ojzb2azq.cloudfront.net/products/Tactile/PTS810/documents/datasheet.pdf, componentlink2description="DigiKey Link", componentlink2url=http://digikey.com/product-detail/en/c-k/PTS810-SJM-250-SMTR-LFS/CKN10502CT-ND/4176673, lastupdated="9/04/2020 10:00:13", Lifecycle Status=Active, Minimum Order=1, Mounting Type="Surface Mount", Outline="4.20mm x 3.20mm", packaging=TapeAndReel, Part Number="PTS810 SJM 250 SMTR LFS", Part Status=Active, Price=0.16, series=PTS810, Supplier 1=DigiKey, Switch Function=Off-Mom, Termination Style="J Lead", Illumination=Non-Illuminated
S2_1: library part SS312SAH4-R, "SWITCH SLIDE SPDT 0.4VA 28V", Part Number=SS312SAH4-R
U1_1: library part CMP-12105-000145-1, "IC MCU 32BIT 1MB FLASH 100LQFP", Case/Package=LQFP, Frequency=216MHz, Max Operating Temperature=85°C, Min Operating Temperature=-40°C, Core Architecture=ARM, Memory Size=1MB, Memory Type=FLASH, Number of I/Os=82, Oscillator Type=Internal, packaging=Tray, Peripherals="Brown-out Detect/Reset", RoHS Compliant=Yes, Interface=I2C
U2_1: "High-performance 6-axis inertial sensor (accelerometer + gyroscope) <a href=\"https://pricing.snapeda.com/parts/BMI088/Bosch%20Sensortec/view-part?ref=eda\">Check prices</a>", Package=None, Availability=Unavailable, MP=BMI088, Price=None
U3_1: "Accelerometer, Gyroscope, 6 Axis Sensor Output", Package=None, Availability=Unavailable, MP=ICM-42688-P, Price=None
U4_1: "Pressure Sensor 4.35PSI ~ 18.13PSI (30kPa ~ 125kPa) Absolute - - 10-WFLGA", Package=None, Check_prices=https://www.snapeda.com/parts/BMP390L/Bosch+Sensortec/view-part/?ref=eda, MF="Bosch Sensortec", MP=BMP390L, SnapEDA_Link=https://www.snapeda.com/parts/BMP390L/Bosch+Sensortec/view-part/?ref=snap
U5_1: library part CMP-0315-00015-3, "IC TRANSCEIVER HALF 1/1 8SOIC", Case/Package=D, Max Operating Temperature=85°C, Max Supply Current=17mA, Max Supply Voltage=3.6V, Min Operating Temperature=-40°C, Min Supply Voltage=3V, Operating Supply Voltage=3.3V, Package Quantity=1, Contact Plating=Gold, Data Rate=1Mbps, Lead Free="Lead Free", Nominal Supply Current=17mA, Number of Drivers=1, Number of Pins=8, Number of Receive Buffers=1, Number of Receivers=1, Number of Transceivers=1, Number of Transmit Buffers=1, Number of I/Os=2, packaging="Tape and Reel", Radiation Hardening=No, REACH SVHC="No SVHC", Termination=SMD/SMT, Weight=0.002561oz
Y1_1: library part "TSX-3225 24.0000MF15X-AC6", "CRYSTAL 24.0000MHZ 9PF SMD", ESR (Equivalent Series Resistance)="40 Ohms", Frequency Stability=±15ppm, Frequency Tolerance=±10ppm, Load Capacitance=9pF, manufacturer=EPSON, Operating Mode=Fundamental, Operating Temperature="-40°C ~ 85°C", Package / Case="4-SMD, No Lead", Supplier Part Number 1=SER4180CT-ND, componentlink1description=Datasheet, componentlink1url=https://support.epson.biz/td/api/doc_check.php?dl=brief_TSX-3225&lang=en, componentlink2description="DigiKey Link", componentlink2url=https://www.digikey.com/en/products/detail/epson/TSX-3225-24-0000MF15X-AC6/5261221, Frequency="24 MHz", Height - Seated (Max)="0.024\" (0.60mm)", lastupdated="3.06.2024 20:02:15", Lifecycle Status=Active, Minimum Order=1, Mounting Type="Surface Mount", packaging=TapeAndReel, Part Number="TSX-3225 24.0000MF15X-AC6", Part Status=Active, partid=432, Price=0.20, series=TSX-3225, Size / Dimension="0.126\" L x 0.098\" W (3.20mm x 2.50mm)", Supplier 1=DigiKey, Type="MHz Crystal"
Y2_1: library part ABS07-32.768KHZ-7-T, "CRYSTAL 32.7680KHZ 7PF SMD", Part Number=ABS07-32.768KHZ-7-T

## Via types
v1: diameter 17.72, hole 11.81, Top Layer to Bottom Layer, 57 vias
v2: diameter 23.62, hole 11.81, Top Layer to Bottom Layer, 28 vias
v3: diameter 17.72/17.72 (per signal layer), hole 11.81, Top Layer to Bottom Layer, 1 vias

## Nets (pads, with @x,y where several pads share a name; then routed paths per layer and width w, separated by ;. In a path a pad name is that pad's centre, name@x,y a point inside that pad or via, vN(x,y) a via of type N, cw(c..) or ccw(c..) an arc to the next point about the centre after c; other vN are vias at no path point)
"3.3 V": 
"5 V": 
5V: 
BOOT: 
DN: 
DP: 
GND: 
NetC2_2: 
NetC3_2: 
NetC5_2: 
NetC28_2: 
NetC29_2: 
NetC31_1: 
NetC32_2: 
NetC35_1: 
NetC36_1: 
NetC40_1: 
NetD1_A: 
NetD2_1: 
NetD2_3: 
NetD2_5: 
NetD3_1: 
NetD3_2: 
NetD4_A: 
NetD5_2: 
NetDS1_1: 
NetDS1_2: 
NetJ2_A5: 
NetJ2_B5: 
NetJ3_1: 
NetJ3_2: 
NetJ3_3: 
NetJ3_5: 
NetJ3_7: 
NetJ3_8: 
NetJ4_3: 
NetJ4_4: 
NetJ5_2: 
NetJ5_3: 
NetJ5_4: 
NetJ5_5: 
NetJ6_2: 
NetJ6_3: 
NetJ7_2: 
NetJ7_3: 
NetJ9_2: 
NetJ9_3: 
NetJ9_4: 
NetJ9_5: 
NetJ10_2: 
NetJ10_3: 
NetJ10_4: 
NetJ10_5: 
NetJ11_2: 
NetJ11_3: 
NetJ11_4: 
NetP1_2: 
NetP1_3: 
NetP1_4: 
NetP1_5: 
NetR2_1: 
NetR5_1: 
NetR6_1: 
NetR7_1: 
NetR7_2: 
NetR8_1: 
NetR9_1: 
NetR13_1: 
NetR15_1: 
NetR17_2: 
NetR24_2: 
NetR25_1: 
NetR27_1: 
NetR29_2: 
NetR32_2: 
NetR33_2: 
NetR34_2: 
NetR35_2: 
NetR36_2: 
NetR37_2: 
NetR38_2: 
NetR39_2: 
NetR41_2: 
NetR44_2: 
NetR46_2: 
NetR48_2: 
NetR50_2: 
NetR51_2: 
NetR53_2: 
NetR54_2: 
NetR55_2: 
NetR56_2: 
NetR57_2: 
NetR58_2: 
NetR59_2: 
NetR60_2: 
NetR61_2: 
NetR63_2: 
NetR65_2: 
NetR67_2: 
NetR69_2: 
NetR71_2: 
NetU1_1: 
NetU1_2: 
NetU1_3: 
NetU1_4: 
NetU1_51: 
NetU1_52: 
NetU1_53: 
NetU1_54: 
NetU1_57: 
NetU1_58: 
NetU1_77: 
NetU1_89: 
NetU1_91: 
NetU1_97: 
OSC32In: 
OSC32Out: 
OSCIn: 
OSCOut: 
RST: 
SWCLK: 
SWDIO: 
VCap2: 